# Altium PCB SOM_PCB_6Layer.PcbDoc (part 6 of 6)
Units mil, origin at the board's own origin, x right, y up, seen from the top; angles counter-clockwise.
Board outline 1230 x 2725 mil, 6 copper layers (Top Layer, GND+SHIELD, MidLayer1, MidLayer2, PWR, Bottom Layer), stack 60.8 mil thick; 76 components, 194 nets, 972 pads, 577 vias.
Unrouted connection lines stored in the file: 151.
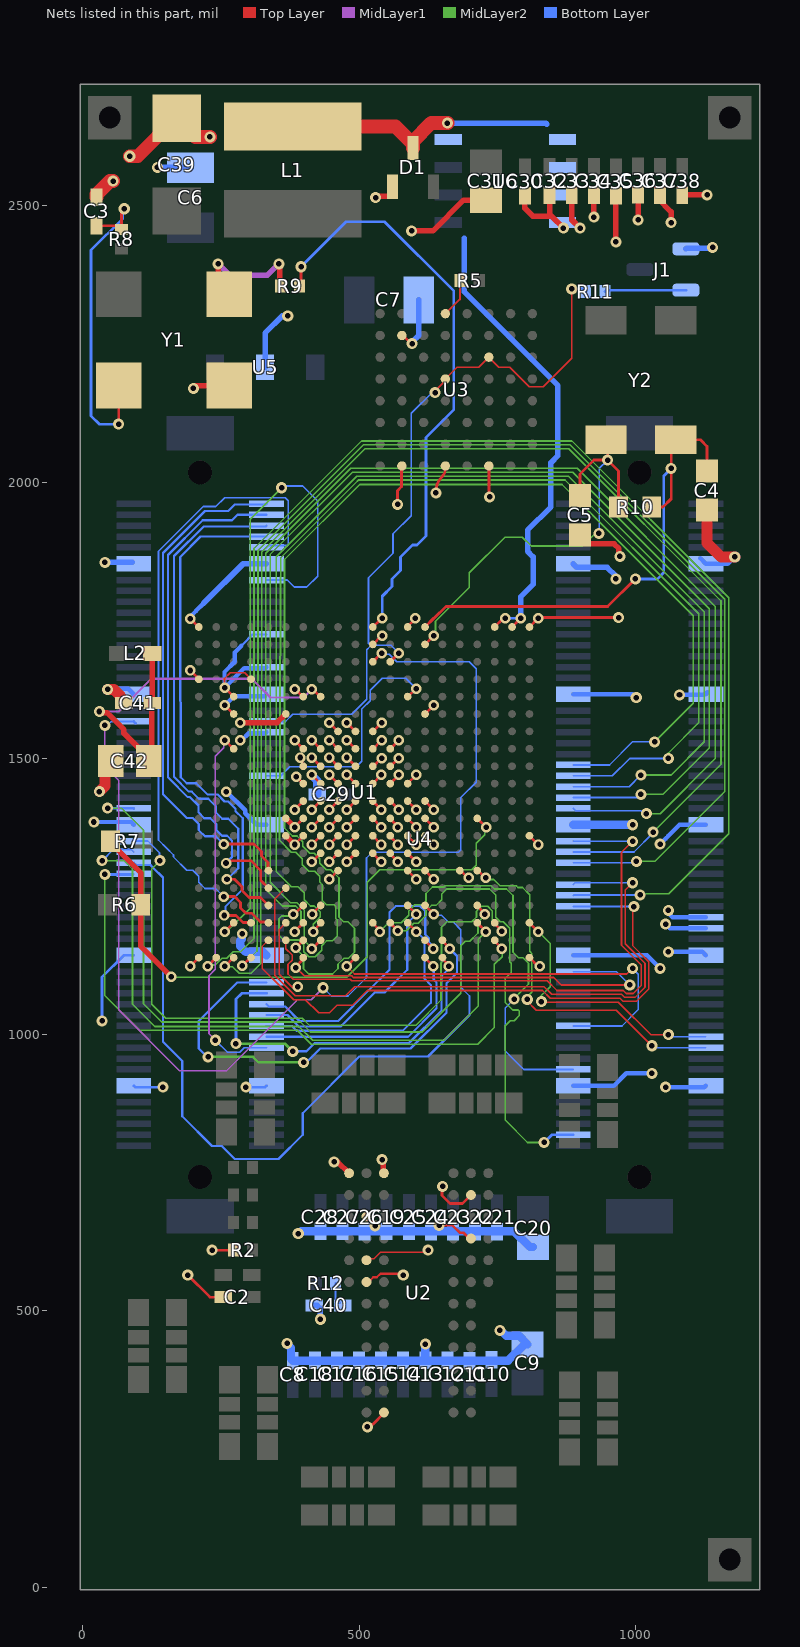
[diagram p9: the nets of this part, all layers, seen from the top]

## Via types
v1: diameter 19, hole 10, Top Layer to Bottom Layer, tented both sides, 352 vias
v2: diameter 20, hole 10, Top Layer to Bottom Layer, tented both sides, 223 vias
v3: diameter 20, hole 10, Top Layer to Bottom Layer, 1 vias
v4: diameter 30, hole 15, Top Layer to Bottom Layer, tented both sides, 1 vias

## Nets (pads, with @x,y where several pads share a name; then routed paths per layer and width w, separated by ;. In a path a pad name is that pad's centre, name@x,y a point inside that pad or via, vN(x,y) a via of type N, cw(c..) or ccw(c..) an arc to the next point about the centre after c; other vN are vias at no path point) (continued)
GND: C2.1 C3.1 C4.1 C5.1 C6.2 C7.2 C8.1 C9.1 C10.1 C11.1 C12.1 C13.1 C14.1 C15.1 C16.1 C17.1 C18.1 C19.1 C20.1 C21.1 C22.1 C23.1 C24.1 C25.1 C26.1 C27.1 C28.1 C29.1 C30.1 C31.1 C32.1 C33.1 C34.1 C35.1 C36.1 C37.1 C38.1 C39.2 C40.1 C41.1 C42.1 D1.3 J1.1 R2.1 U1.A1 U1.A13 U1.A20 U1.B11 U1.D1 U1.D4 U1.E3 U1.E7 U1.F3 U1.F6 U1.F14 U1.G9 U1.G10 U1.G11 U1.H7 U1.H8 U1.H9 U1.H10 U1.H11 U1.H12 U1.J7 U1.J8 U1.J9 U1.J10 U1.J11 U1.J12 U1.K7 U1.K8 U1.K9 U1.K10 U1.K11 U1.K12 U1.K13 U1.L7 U1.L8 U1.L9 U1.L10 U1.L11 U1.L12 U1.L13 U1.L14 U1.M6 U1.M7 U1.M8 U1.M9 U1.M10 U1.M11 U1.M12 U1.M13 U1.M14 U1.N6 U1.N7 U1.N8 U1.N9 U1.N10 U1.N11 U1.N12 U1.N13 U1.N14 U1.N20 U1.P8 U1.P9 U1.P10 U1.P11 U1.P12 U1.P13 U1.R9 U1.R13 U1.R14 U1.R16 U1.U8 U1.V6 U1.Y1 U1.Y20 U2.A1 U2.A3 U2.B8 U2.C2 U2.D8 U2.E2 U2.F2 U2.M3 U3.B2 U3.H2 U3.H4 U3.H6 U4.61 U4.64 U4.68 U4.183 U4.184 U4.201 U4.202 U4.203 U4.204 U4.205 U4.206 U4.207 U4.208 U4.209 U4.210 U4.213 U4.214 U4.215 U4.216 U4.217 U4.218 U4.219 U4.220 U4.221 U4.222 U5.2 Y1.2 | length 7856.5
  Top Layer w3: v1(256.53,1627.72) 256.61,1627.79 256.61,1644.72 266.85,1654.96 293.03,1654.96 U1.D4@304.53,1643.46 ; U1.V6@367.52,1202.52 355.52,1190.52 355.52,1127.82 355.52,1109.48 380,1085 387.55,1085 v1(389.01,1086.46) ; U2.E2@513.5,591.89 516.01,594.4 527,594.4 538.99,606.39 621.39,606.39 v2(625,610)
  Top Layer w4: U2.F2@513.5,552.52 517.29,552.52 525.66,560.89 532.16,560.89 538.79,567.52 577.48,567.52 v2(580,565)
  Top Layer w5: v2(190,565) 230,525 C2.1@254.24,525 ; v1(194.29,1123.78) U1.Y1@210.04,1139.53 ; v1(194.5,1659.21) 194.5,1659.11 210.04,1643.57 U1.D1@210.04,1643.46 ; v1(194.5,1752.9) 194.8,1752.9 209.74,1737.95 U1.A1@210.04,1737.95 ; v2(234,610) R2.1@272.48,610 ; v1(256.53,1627.72) 257.28,1627.72 U1.E3@273.03,1611.97 ; v1(257.28,1596.22) U1.F3@273.03,1580.47 ; v1(383.27,1344.25) U1.N7@399.02,1360 ; v1(383.27,1375.75) U1.M7@399.02,1391.5 ; v1(383.27,1407.24) U1.L7@399.02,1422.99 ; v1(383.27,1533.23) U1.H7@399.02,1517.48 ; v1(383.27,1625.21) 384.52,1625.21 397.76,1611.97 U1.E7@399.02,1611.97 ; v1(386.26,1467.25) U1.K7@399.02,1454.49 ; v1(394.02,1501.73) 394.02,1497.94 397.29,1494.67 397.29,1487.71 U1.J7@399.02,1485.98 ; v1@412.69,1220 v1(414.92,1217.77) 414.92,1218.1 430.51,1233.69 U1.U8@430.51,1234.02 ; v1(414.76,1312.76) U1.P8@430.51,1328.5 ; v1(414.76,1344.25) U1.N8@430.51,1360 ; v1(414.76,1375.75) U1.M8@430.51,1391.5 ; v1(414.76,1407.24) U1.L8@430.51,1422.99 ; v1(414.76,1470.24) U1.K8@430.51,1454.49 ; v1(414.76,1501.73) U1.J8@430.51,1485.98 ; v1(414.76,1533.23) U1.H8@430.51,1517.48 ; v1(446.26,1281.26) U1.R9@462.01,1297.01 ; v1(446.26,1312.76) U1.P9@462.01,1328.5 ; v1(446.26,1344.25) U1.N9@462.01,1360 ; v1(446.26,1375.75) U1.M9@462.01,1391.5 ; v1(446.26,1407.24) U1.L9@462.01,1422.99 ; v1(446.26,1470.24) U1.K9@462.01,1454.49 ; v1(446.26,1501.73) U1.J9@462.01,1485.98 ; v1(446.26,1533.23) U1.H9@462.01,1517.48 ; v1(446.26,1564.72) U1.G9@462.01,1548.98 ; v1(477.76,1312.76) U1.P10@493.5,1328.5 ; v1(477.76,1344.25) U1.N10@493.5,1360 ; v1(477.76,1375.75) U1.M10@493.5,1391.5 ; v1(477.76,1407.24) U1.L10@493.5,1422.99 ; v1(477.76,1470.24) U1.K10@493.5,1454.49 ; v1(477.76,1501.73) U1.J10@493.5,1485.98 ; v1(477.76,1533.23) U1.H10@493.5,1517.48 ; v1(477.76,1564.72) U1.G10@493.5,1548.98 ; U2.C2@513.5,670.63 514.37,670.63 529.05,655.95 v2(529.05,654.05) ; v2(515,290) 519.06,290 524.06,295 525,295 545,315 U2.M3@545,316.3 ; U1.P11@525,1328.5 525,1328.13 540,1313.13 v1(540,1312.76) ; U1.N11@525,1360 525,1359.63 540,1344.63 v1(540,1344.25) ; U1.M11@525,1391.5 525,1391.12 540,1376.12 v1(540,1375.75) ; U1.L11@525,1422.99 525,1422.62 540,1407.62 v1(540,1407.24) ; U1.K11@525,1454.49 525,1454.86 540,1469.86 v1(540,1470.24) ; U1.J11@525,1485.98 525.87,1485.98 539.88,1500 v1(540.75,1500) ; U1.H11@525,1517.48 v1(540.75,1533.23) ; U1.G11@525,1548.98 v1(540.75,1564.72) ; U1.B11@525,1706.46 540.75,1722.2 v1(542,1722.2) ; U1.P12@556.5,1328.5 556.5,1327.38 570,1313.88 v1(570,1312.76) ; U1.N12@556.5,1360 556.5,1358.88 570,1345.37 v1(570,1344.25) ; U1.M12@556.5,1391.5 556.5,1390.37 570,1376.87 v1(570,1375.75) ; U1.L12@556.5,1422.99 v1(572.24,1407.24) ; U1.K12@556.5,1454.49 v1(572.24,1470.24) ; U1.J12@556.5,1485.98 557.24,1485.98 571.5,1500.24 v1(572.24,1500.24) ; U1.H12@556.5,1517.48 v1(572.24,1533.23) ; v2(570,1960) 569.5,1960.5 569.5,1984.5 577,1992 577,2028.89 U3.H2@577.52,2029.41 ; U3.B2@577.52,2265.63 579.4,2265.63 594.07,2250.96 v2(595.96,2250.96) ; U1.R13@587.99,1297.01 v1(603.74,1281.26) ; U1.P13@587.99,1328.5 v1(603.74,1312.76) ; U1.N13@587.99,1360 v1(603.74,1344.25) ; U1.M13@587.99,1391.5 v1(603.74,1375.75) ; U1.L13@587.99,1422.99 v1(603.74,1407.24) ; U1.K13@587.99,1454.49 v1(603.74,1470.24) ; U1.A13@587.99,1737.95 587.99,1738.82 602,1752.83 v1(602,1753.7) ; U1.R14@619.49,1297.01 v1(635.24,1281.26) ; U1.N14@619.49,1360 v1(635.24,1344.25) ; U1.M14@619.49,1391.5 v1(635.24,1375.75) ; U1.L14@619.49,1422.99 v1(635.24,1407.24) ; U1.F14@619.49,1580.47 v1(635.24,1596.22) ; v2(639,1980.5) 639,1982.5 cw(c678.83,1982.5) 650.67,2010.67 ccw(c637.17,2024.17) 650.71,2010.71 ccw(c637.17,2024.17) 653.96,2015.09 ccw(c637.17,2024.17) 656.26,2024.17 U3.H4@656.26,2029.41 ; v2(645,655) 669.16,655 682.66,641.5 689.39,641.5 699.63,631.26 U2.D8@702.48,631.26 ; v2(651.15,725.37) 650,724.22 650,709.06 664.56,694.5 686.98,694.5 U2.B8@702.48,710 ; U1.R16@682.48,1297.01 683.73,1297.01 696.98,1283.76 v1(698.23,1283.76) ; U3.H6@735,2029.41 735,1974.93 v2(736.43,1973.5) ; U1.Y20@808.46,1139.53 823.99,1124 v1(826.72,1124) ; U1.N20@808.46,1360 v1(824.21,1344.25) ; U1.A20@808.46,1737.95 808.46,1738.1 824.2,1753.83 v1(824.2,1753.98) 825.22,1755 v2(970,1755)
  Top Layer w8: C42.1@31.36,1475.77 C42.1@50.59,1495
  Top Layer w10: v2(200,2170) 205,2175 Y1.2@265,2175 ; v1(285,1565) 351.88,1565 367.35,1580.47 U1.F6@367.52,1580.47 ; U1.N6@367.52,1360 v1(383.27,1344.25) ; U1.M6@367.52,1391.5 v1(383.27,1375.75) ; v2(455,770) 461.38,770 U2.A1@482.01,749.37 ; v2(530,2515) 532.71,2515 535.71,2518 555.2,2518 560.2,2523 D1.3@560.2,2535 ; v2(541.63,774) 543.47,772.16 543.47,750.9 U2.A3@545,749.37 ; v2(595,2455) 633.67,2455 689.26,2510.59 C31.1@730,2510.59 ; C30.1@800,2518.47 800,2495.86 814.47,2481.39 848.61,2481.39 ; C32.1@845,2519.24 845,2485 848.61,2481.39 ; v2(870,2460) 848.61,2481.39 ; C33.1@885,2519.24 885,2475 v2(900,2460) ; C5.1@900,1904.5 900,1903.5 915,1888.5 961.5,1888.5 970.25,1879.75 970.25,1867.83 v2(972.16,1865.91) ; v2(925,2480) C34.1@925,2519.24 ; v2(965,2435) C35.1@965,2518.47 ; v2(1005,2475) C36.1@1005,2520 ; C37.1@1045,2519.24 1040,2514.24 1065,2489.24 v2(1065,2470) ; C38.1@1085,2519.24 1085.76,2520 v2(1130,2520)
  Top Layer w20: v2(30,1440) 40.5,1450.5 40.5,1484.91 C42.1@50.59,1495 ; v2(45,1625) 56.6,1625 68.31,1613.28 68.31,1600.84 69.16,1600 C41.1@74.24,1600 ; C4.1@1130,1949.5 1130,1890 1155,1865 v2(1180,1865)
  Top Layer w25: C3.1@25,2515.76 25,2520.84 49.16,2545 v2(55,2545) ; v2(85,2590) 99.51,2590 168.63,2659.11 C39.2@170,2659.11 204.11,2625 v2(230,2625)
  Bottom Layer w3: U4.205@89.72,1855 U4.205@92.28,1852.44
  Bottom Layer w4: 287.18,1704.02 299.36,1716.2 299.36,1717 306.85,1724.49 U4.61@332.44,1724.49
  Bottom Layer w5: v2(35,1025) 35,1104.21 74.57,1143.78 U4.202@92.28,1143.78 ; U4.201@92.28,907.56 94.84,905 v2(145,905) ; v2(295,905) 329.88,905 U4.210@332.44,907.56
  Bottom Layer w8: v2(20,1385) 87.28,1385 U4.203@92.28,1380 ; v2@44,1626 82.5,1626 U4.204@92.28,1616.22 ; v1(194.5,1752.9) 194.5,1756.26 204.18,1765.94 204.18,1766.23 218.97,1781.03 ; v1(257.28,1596.22) 273.78,1612.72 328.94,1612.72 U4.207@332.44,1616.22 ; v1(259.99,1439.99) 293.94,1406.04 293.94,1400.72 299.23,1395.44 299.29,1395.44 314.72,1380 U4.208@332.44,1380 ; v1(285.28,1533.23) 288.26,1533.23 300.45,1545.42 330.54,1545.42 U4.68@332.44,1547.32 ; 287.18,1704.02 275,1691.83 275,1675 256.53,1656.53 v1(256.53,1627.72) 292.34,1663.53 330.54,1663.53 U4.64@332.44,1665.43 ; U4.213@887.56,907.56 961.31,907.56 983.75,930 v2(1030,930) ; U4.214@887.56,1143.78 1021.22,1143.78 v2(1045,1120) ; U4.216@887.56,1616.22 995.53,1616.22 v2(1001.75,1610) ; v2(1045,1345) 1055,1355 1055.31,1355 1060,1359.69 1060,1360 1080,1380 U4.220@1127.72,1380 ; v2(1055,905) 1125.16,905 U4.218@1127.72,907.56 ; v2(1055,1200) 1062.01,1192.99 U4.184@1127.72,1192.99 ; v2(1060,1150) 1121.5,1150 U4.219@1127.72,1143.78 ; v2(1060,1225) 1060,1220 1067.32,1212.68 U4.183@1127.72,1212.68 ; v2(1080,1615) 1125,1615 1130,1620 1130,1618.5 U4.221@1127.72,1616.22 ; U4.222@1117.94,1862.22 U4.222@1127.72,1852.44 1167.44,1852.44 v2(1180,1865)
  Bottom Layer w10: v2(40,1855) U4.205@89.72,1855 ; v2(135,2570) 194.13,2570 C6.2@195,2569.13 ; 218.97,1781.03 290.39,1852.44 U4.206@332.44,1852.44 ; U5.2@330,2208.3 330,2270 361,2301 v2(371,2301) ; C40.1@419.24,510 424.16,510 430,504.16 v2(430,485) ; v2(595.96,2250.96) 595.96,2253.66 608.27,2265.97 C7.2@608.27,2330 ; U4.217@887.56,1852.44 894,1846 949,1846 965,1830 v2(965,1825) ; J1.1@1091.73,2422.4 1093.03,2423.7 1138.7,2423.7 v2(1140,2425)
  Bottom Layer w15: v1(288.63,1182.72) 287.87,1181.96 287.87,1172.98 285,1170.12 285,1160 294.94,1150.06 326.16,1150.06 U4.209@332.44,1143.78 ; v2(370,441.5) 370.96,440.54 370.96,439.04 376.66,433.34 376.66,413.34 C8.1@380,410 C11.1@700,410 769.88,410 799.29,439.41 C9.1@805,439.41 789.27,455.14 766.22,455.14 756.35,465 v2(755,465) ; v2(390,640) 391.35,640 395.59,644.24 C28.1@430,644.24 C27.1@470,644.24 C19.1@550,644.24 C25.1@590,644.24 780.65,644.24 809.29,615.59 C20.1@815,615.59 ; v1(414.76,1470.24) 414.76,1469.15 424.24,1459.68 C29.1@424.24,1435 ; C13.1@620,410.76 v2(620,440) ; U4.215@887.56,1380 v2(995,1380)
JTAG_E\M\U\: U1.R5 U4.51 | length 928.3
  Top Layer w5: v1(255,1345) 310,1345 323.52,1331.48 323.52,1323.33 335.34,1311.51 335.34,1297.69 U1.R5@336.02,1297.01
  Bottom Layer w4: v1(255,1345) 254.81,1345 240.56,1359.25 221.07,1359.25 210.04,1370.28 210.04,1381.21 199.01,1392.24 188.08,1392.24 151.75,1428.57 145,1435.32 145,1871.77 221.3,1948.07 263.43,1948.07 275,1959.64 331.37,1959.64 U4.51@332.44,1960.71
JTAG_T\R\S\T\: U1.T5 U4.52 | length 942.2
  Top Layer w5: v1(259.22,1310.78) 260,1311.55 260,1312.07 262.93,1315 304.21,1315 322,1297.21 322,1279.53 U1.T5@336.02,1265.51
  Bottom Layer w4: v1(259.22,1310.78) 270,1321.55 270,1351.21 261.21,1360 251.82,1360 241.45,1370.37 241.45,1381.3 230.84,1391.91 219.91,1391.91 209.29,1402.53 209.29,1414.7 193.99,1430 190,1430 155.43,1464.57 154.45,1465.55 154.45,1796.24 154.23,1796.45 154.23,1868.27 217.21,1931.25 270.23,1931.25 280,1941.02 U4.52@332.44,1941.02
JTAG_TCK: U1.V3 U4.56 | length 1189.6
  Top Layer w5: v1(257.28,1186.77) U1.V3@273.03,1202.52
  MidLayer2 w3: v1(257.28,1186.77) 260.77,1186.77 302.9,1228.9 302.9,1932.9 v2(360,1990)
  Bottom Layer w3: U4.56@332.44,1822.91 370.17,1822.91 382.75,1810.33 405.33,1810.33 425,1830 425,1966.09 397.9,1993.19 363.19,1993.19 v2(360,1990)
JTAG_TDI: U1.V5 U4.55 | length 1196.8
  Top Layer w5: v1(255,1250) 275,1250 285.53,1239.47 285.53,1229.47 295,1220 305.55,1220 321.52,1204.03 334.51,1204.03 U1.V5@336.02,1202.52
  Bottom Layer w3: v1(255,1250) 240.24,1264.76 221.07,1264.76 210.04,1275.79 210.04,1286.73 199.01,1297.76 188.08,1297.76 164.04,1321.8 164.04,1325.42 151.75,1337.71 137,1352.46 137,1875.08 217.99,1956.07 240.88,1956.07 256.93,1972.11 366.22,1972.11 372.13,1966.2 372.13,1887.13 370.37,1885.37 335.85,1885.37 U4.55@332.44,1881.97
JTAG_TDO: U1.V4 U4.54 | length 959.8
  Top Layer w5: v1(255.85,1215.79) 277.44,1215.79 290.03,1203.2 303.85,1203.2 U1.V4@304.53,1202.52
  Bottom Layer w4: v1(255.85,1215.79) 258.52,1218.45 258.52,1232.3 289.41,1263.2 289.41,1391.82 276.16,1405.07 276.16,1409.58 263.45,1422.29 256.48,1422.29 243.77,1435 225.52,1435 205.29,1455.24 188.08,1455.24 177.38,1465.94 177.38,1500.01 176.23,1705.01 176.23,1792.61 176.23,1796.24 176.23,1864.82 213.07,1901.65 U4.54@332.44,1901.65
JTAG_TMS: U1.U5 U4.53 | length 949.9
  Top Layer w5: v1(261,1281.26) 274.96,1281.26 288.35,1267.87 288.35,1261.33 301.15,1248.53 321.5,1248.53 U1.U5@336.02,1234.02
  Bottom Layer w4: v1(261,1281.26) 261.2,1281.26 281.41,1301.47 281.41,1372.84 263.5,1390.75 252.57,1390.75 240.79,1402.53 240.79,1413.46 227.24,1427 210.12,1427 197.12,1440 192,1440 165,1467 165,1796.24 165,1866.31 218.69,1920 331.1,1920 U4.53@332.44,1921.34
N\M\I\: U1.C11 U4.34 | length 2100
  Top Layer w5: U1.C11@525,1674.96 v1(540.75,1690.71)
  MidLayer1 w3: v2(40,1560) 40,1485 65,1460 65,1045 175,935 260.15,935 388.65,1063.5 413.5,1063.5 v2(435,1085)
  Bottom Layer w3: v2(40,1560) 44.6,1560 51.61,1567.01 U4.34@92.28,1567.01 ; v2(435,1085) 450,1070 480,1070 513.56,1103.56 513.56,1320 523.56,1330 680,1330 684.23,1334.23 684.23,1429.23 712.23,1457.23 712.23,1662.51 699.74,1675 568.15,1675 554.75,1688.41 543.05,1688.41 v1(540.75,1690.71)
  Bottom Layer w5: U4.34@92.28,1567.01 U4.34@95.69,1563.6
NetC3_2: C3.2 R8.2 Y1.1 | length 613.4
  Top Layer w5: C3.2@25,2464.24 63.28,2464.24 R8.2@70,2457.52 70,2485.94 75,2490.94 v2(75,2495) ; v2(65,2105) Y1.1@65,2175
  Bottom Layer w5: v2(65,2105) 30,2105 15,2120 15,2420 72.5,2477.5 72.5,2492.5 v2(75,2495)
NetC4_2: C4.2 R10.1 U1.A14 Y2.1 | length 949.3
  Top Layer w5: U1.A14@619.49,1737.95 635.24,1753.7 636,1753.7 657.3,1775 950,1775 v2(1000,1825) ; R10.1@1030,1955 1050,1955 1065,1970 v2(1065,2025) 1065,2068.74 Y2.1@1072.99,2076.73 1084.8,2076.73 1118.27,2076.73 1119.98,2075.02 1130,2065 C4.2@1130,2020.5 C4.2@1112.5,2038
  Bottom Layer w5: v2(1000,1825) 1040,1825 1051.5,1836.5 1051.5,2011.5 v2(1065,2025)
NetC5_2: C5.2 R10.2 U1.B14 Y2.4 | length 830.4
  Top Layer w3: R10.2@955.33,1969.43 R10.2@969.76,1955
  Top Layer w5: U1.B14@619.49,1706.46 v1(635.24,1722.2) ; C5.2@900,1975.5 900,2015 925,2040 v2(950,2040) ; Y2.4@947.01,2076.73 950,2073.74 v2(950,2040) ; R10.2@969.76,1955 969.76,2020.24 v2(950,2040)
  MidLayer2 w3: v1(635.24,1722.2) 638.3,1725.27 638.3,1748.3 699.5,1809.5 699.5,1835.96 764.04,1900.5 795.42,1900.5 811.42,1884.5 904.5,1884.5 926.95,1906.95 v2(934,1907.5)
  Bottom Layer w3: v2(934,1907.5) 934,1909 935,1910 935,2025 v2(950,2040)
NetC40_2: C40.2 R12.1 | length 38.1
  Bottom Layer w4: R12.1@457.52,550 457.52,522.48 C40.2@465,515
NetC41_2: C41.2 C42.2 L2.2 U1.E8 | length 782.5
  Top Layer w5: v1(414.76,1625.21) 416.02,1625.21 429.26,1611.97 U1.E8@430.51,1611.97
  Top Layer w10: v2(30,1585) 31.91,1583.09 43.78,1583.09 74.53,1552.34 74.53,1545.59 119.41,1500.71 C42.2@119.41,1495 122.26,1497.85 125,1500.59 125,1599.24 C41.2@125.76,1600 125.51,1600.25 L2.2@125.51,1690
  MidLayer1 w4: v2(30,1585) 65,1585 124.15,1644.15 305.85,1644.15 339.79,1610.21 399.76,1610.21 v1(414.76,1625.21)
NetD1_1: D1.1 L1.1 U6.5 U6.6 U6.7 U6.8 | length 499.5
  Top Layer w25: L1.1@380,2643.74 565.86,2643.74 D1.1@597.6,2612 ; D1.1@597.6,2605 D1.1@597.6,2612 ; v2(660,2650) 630.6,2650 597.6,2617 D1.1@597.6,2612
  Bottom Layer w10: v2(660,2650) 838.25,2650 840,2648.25
NetJ1_2: J1.2 R11.1 | length 147.8
  Bottom Layer w5: R11.1@945,2345 947.6,2347.6 J1.2@1091.73,2347.6
NetR5_1: R5.1 U3.A4 | length 70.9
  Top Layer w4: U3.A4@656.26,2305 682.48,2331.22 R5.1@682.48,2365
NetR6_1: R6.1 R7.1 U1.M17 | length 1105.1
  Top Layer w5: U1.M17@713.98,1391.5 729.72,1375.75 v1(730,1375.75)
  Top Layer w10: R7.1@50,1350 50,1347.64 105.12,1292.52 R6.1@105.12,1235 105.12,1159.88 v1(160,1105)
  MidLayer2 w3: v1(160,1105) 161.22,1103.78 477.55,1103.78 515,1141.22 515,1276.06 537.7,1298.76 704.03,1298.76 712.23,1306.96 712.23,1346.55 727.42,1361.75 727.42,1373.17 v1(730,1375.75)
NetR9_1: R9.1 Y1.3 | length 230.5
  Top Layer w10: v2(245,2395) 245,2360.35 Y1.3@265,2340.35 ; v2(355,2395) 356.24,2393.76 356.24,2356.24 R9.1@357.48,2355
  MidLayer1 w10: v2(245,2395) 245.86,2395 265.86,2375 334.14,2375 354.14,2395 v2(355,2395)
NetR9_2: R9.2 U1.A11 | length 1072.5
  Top Layer w5: R9.2@392.52,2355 395,2357.48 v2(395,2390) ; U1.A11@525,1737.95 525.63,1737.95 541.37,1753.7 v1(542,1753.7)
  Bottom Layer w5: v2(395,2390) 476.5,2471.5 545.84,2471.5 671.57,2345.77 671.57,2131.57 621,2081 621,1902.67 604.83,1886.5 596.7,1886.5 575,1864.8 575,1840 559.84,1824.84 559.84,1811.5 542,1793.67 v1(542,1753.7)
NetU1_A18: U1.A18 U1.A19 U6.4 | length 871.2
  Top Layer w5: U1.A18@745.47,1737.95 745.47,1738.06 761,1753.59 764.89,1753.59 v1(765,1753.7) ; U1.A19@776.97,1737.95 792.72,1753.7 v1(793,1753.7)
  Bottom Layer w5: v1(765,1753.7) v1(793,1753.7)
  Bottom Layer w10: 690,2441.75 690,2345 860,2175 860,2048.13 847.06,2035.19 847.06,1955.19 805,1913.13 805,1875 815,1865 815,1815 793,1793 v1(793,1753.7)
PB2: U1.T6 U4.121 | length 1192.3
  Top Layer w3: U1.T6@367.52,1265.51 347.52,1245.52 347.52,1107.48 362.76,1092.24 373.76,1081.24 384.5,1070.5 475.6,1070.5 492.1,1087 834.82,1087 848.82,1073 975.18,1073 980.68,1067.5 999.32,1067.5 1017.5,1085.68 1017.5,1129.32 982,1164.82 982,1262 v2(995,1275)
  Bottom Layer w3: U4.121@887.56,1271.73 890.83,1275 v2(995,1275)
RESET: R11.2 U1.C12 U3.C6 U3.D4 U4.67 | length 1365.4
  Top Layer w3: v2(637.7,2162.3) 637.7,2165.31 656.26,2183.87 U3.D4@656.26,2186.89 677.26,2207.89 716.63,2207.89 U3.C6@735,2226.26 753.12,2208.13 772.92,2208.13 788.37,2192.69 788.37,2192.46 807.94,2172.89 833.5,2172.89 885,2224.39 v2(885,2350)
  Top Layer w5: U1.C12@556.5,1674.96 v1(572.24,1690.71)
  Bottom Layer w3: U4.67@332.44,1567.01 367.01,1567.01 380,1580 486.97,1580 514.07,1607.1 514.07,1696.57 520,1702.5 520,1705 ; v1(572.24,1690.71) 557.95,1705 520,1705 ; v2(637.7,2162.3) 635.22,2162.3 633.76,2163.76 594.53,2124.53 594.53,1939.53 561.5,1906.5 561.5,1871.5 517.06,1827.06 517.06,1707.94 520,1705 ; R11.2@904.96,2350 R11.2@909.96,2345
  Bottom Layer w4: v2(885,2350) R11.2@904.96,2350
RSCLK0: U1.H3 U4.93 | length 687.3
  Top Layer w5: v1(257.28,1533.23) U1.H3@273.03,1517.48
  MidLayer1 w3: v2(240,990) 228.48,1001.52 228.48,1106.67 240,1118.19 240,1504.25 254.98,1519.23 254.98,1530.93 v1(257.28,1533.23)
  Bottom Layer w3: v2(240,990) 262,968 283.92,968 292.38,976.46 U4.93@332.44,976.46
SCL1: U1.W5 U4.119 | length 1095.1
  Top Layer w3: U1.W5@336.02,1171.02 324.52,1159.52 324.52,1120.58 363.86,1081.24 381.6,1063.5 402.8,1063.5 426.8,1039.5 446.42,1039.5 460.11,1053.19 488.19,1053.19 515,1080 831.92,1080 845.92,1066 972.28,1066 977.78,1060.5 1002.22,1060.5 1024.5,1082.78 1024.5,1132.22 995.09,1161.62 995.09,1228.14 997.5,1230.54 v2(997.5,1231.68)
  Bottom Layer w3: U4.119@887.56,1232.36 888.01,1231.92 995.09,1231.92 995.33,1231.68 v2(997.5,1231.68)
SD_CLK: U1.Y15 U4.88 | length 654.5
  Top Layer w5: U1.Y15@650.98,1139.53 650.98,1137.39 662.23,1126.14 v1(662.23,1124)
  MidLayer2 w5: v2(277.17,983.83) 277.5,983.5 366.5,983.5 v2(380,970)
  Bottom Layer w4: v2(380,970) 405,970 420,985 590.46,985 649,1043.54 649,1106.05 662.52,1119.57 662.52,1123.71 v1(662.23,1124)
  Bottom Layer w5: v2(277.17,983.83) 277.5,984.17 277.5,1064.67 287.71,1074.88 U4.88@332.44,1074.88
SD_CMD: U1.W15 U4.87 | length 846.9
  Top Layer w5: U1.W15@650.98,1171.02 650.98,1169.77 664.23,1156.53 v1(664.23,1155.28)
  MidLayer2 w5: v2(227,960) 308.33,960 318.33,950 v2(399.65,950)
  Bottom Layer w4: v2(227,960) 225,960 210,975 210,1025 279.57,1094.57 U4.87@332.44,1094.57 ; v2(399.65,950) 405,950 430,975 593.18,975 658.5,1040.32 658.5,1093.5 677.23,1112.23 677.23,1142.28 v1(664.23,1155.28)
SD_D0: U1.Y14 U4.92 | length 429.5
  Top Layer w5: U1.Y14@619.49,1139.53 619.49,1139.13 634.23,1124.39 v1(634.23,1124)
  Bottom Layer w4: U4.92@332.44,996.14 588.87,996.14 640,1047.27 640,1095 635.24,1099.76 635.24,1122.99 v1(634.23,1124)
SD_D1: U1.V13 U4.91 | length 484.5
  Top Layer w5: U1.V13@587.99,1202.52 v1(603.74,1186.77)
  Bottom Layer w4: U4.91@332.44,1015.83 378.21,1015.83 387.04,1007 579.33,1007 630,1057.67 630,1090 618.74,1101.26 618.74,1171.77 v1(603.74,1186.77)
SD_D2: U1.U13 U4.90 | length 435.6
  Top Layer w5: U1.U13@587.99,1234.02 v1(603.74,1218.27)
  Bottom Layer w4: U4.90@332.44,1035.51 370.55,1035.51 391.06,1015 466.67,1015 528.2,1076.54 546.22,1076.54 587.24,1117.57 587.24,1201.77 v1(603.74,1218.27)
SD_D3: U1.W14 U4.89 | length 547.4
  Top Layer w5: U1.W14@619.49,1171.02 619.49,1170.52 634.23,1155.78 v1(634.23,1155.28)
  Bottom Layer w4: U4.89@332.44,1055.2 336.35,1051.29 366.08,1051.29 392.37,1025 462.47,1025 518.71,1081.24 555.25,1117.77 555.25,1221.78 566.24,1232.77 610.45,1232.77 620,1223.22 620,1181.5 626.24,1175.26 626.24,1168.2 635.04,1159.4 634.23,1158.59 v1(634.23,1155.28)
SDA1: U1.Y2 U4.120 | length 2644.8
  Top Layer w5: v1(225.79,1123.78) U1.Y2@241.54,1139.53
  MidLayer2 w3: v1(225.79,1123.78) 228.09,1126.08 239.79,1126.08 252.13,1138.42 260.64,1138.42 272.22,1150 285.49,1150 310,1174.51 310,1879.9 504.6,2074.5 880.5,2074.5 885.3,2074.5 1169,1790.8 1169,1786 1169,1363.66 1060.34,1255 1010.69,1255 v2(1008.63,1252.94)
  Bottom Layer w3: U4.120@887.56,1252.05 888.45,1252.94 v2(1008.63,1252.94)
TACLK6: U1.Y7 U4.115 | length 753.6
  Top Layer w3: v1(385.55,1121.5) 400.55,1106.5 486.55,1106.5 489.55,1103.5 852.5,1103.5 866,1090 866.75,1090 v2(990,1090)
  Top Layer w5: v1(385.55,1121.5) 385.55,1123.78 399.02,1137.24 U1.Y7@399.02,1139.53
  Bottom Layer w3: U4.115@887.56,1114.25 965.75,1114.25 v2(990,1090)
TMR0: U1.W8 U4.127 | length 2268.7
  Top Layer w5: v1(414.76,1155.28) U1.W8@430.51,1171.02
  MidLayer2 w3: v1(414.76,1155.28) 414.76,1156.63 400.92,1170.47 400.92,1225.8 387.7,1239.03 375.97,1239.03 340.24,1274.76 339.45,1275.55 339,1297.95 cw(c342,1298.01) 339,1298.01 339,1796.24 339,1869 488,2018 887,2018 1134,1771 1134,1519 1050,1435 v2(1010,1435)
  Bottom Layer w3: U4.127@887.56,1429.21 1004.21,1429.21 v2(1010,1435)
TMR1: U1.V8 U4.128 | length 2191.8
  Top Layer w5: v1(417.27,1186.77) 417.27,1188.02 430.51,1201.27 U1.V8@430.51,1202.52
  MidLayer2 w3: v1(417.27,1186.77) 417.27,1199.73 425.17,1208.23 ccw(c414.92,1217.77) 425.43,1208.52 429.76,1213.43 429.76,1222.13 425.45,1227 ccw(c414.92,1217.77) 424.18,1228.27 418.88,1232.98 412.02,1232.98 400.55,1244.45 400.55,1256.84 389.38,1268 377.47,1268 372.73,1272.73 350,1295.47 350,1796.24 350,1865 496,2011 879,2011 1125,1765 1125,1530 1065,1470 v2(1010,1470)
  Bottom Layer w3: U4.128@887.56,1448.9 988.9,1448.9 v2(1010,1470)
TMR2: U1.U7 U4.129 | length 2365.5
  Top Layer w5: v1(380.55,1217.89) 381.04,1218.38 383.38,1218.38 U1.U7@399.02,1234.02
  MidLayer2 w3: v1(380.55,1217.89) 377.66,1215 360,1215 355,1210 355,1180 363.44,1171.56 391.35,1171.56 400.16,1162.75 400.16,1150.08 408.97,1141.28 420.56,1141.28 432.26,1152.97 432.26,1161.07 440.96,1169.78 451.56,1169.78 460.26,1178.48 460.26,1207.48 457.76,1209.98 457.76,1232.24 455,1235 441.22,1235 433.11,1243.11 433.11,1271.89 428.76,1276.24 428.76,1287.06 419.79,1296.03 408.97,1296.03 397.27,1307.73 397.27,1318.55 385.57,1330.25 377.47,1330.25 356.88,1350.84 356,1351.72 356,1354.21 357.74,1796.24 358,1862.9 497.24,2002.24 499,2004 872.82,2004 1115,1761.82 1115,1565 1060,1510 v2(1060,1500)
  Bottom Layer w3: U4.129@887.56,1468.58 958.58,1468.58 990,1500 v2(1060,1500)
TMR3: U1.W7 U4.130 | length 2279.4
  Top Layer w5: v1(385.55,1157.56) U1.W7@399.02,1171.02
  MidLayer2 w3: v1(385.55,1157.56) 385.55,1156.2 399.55,1142.2 399.55,1119.19 408.97,1109.78 452.06,1109.78 462.01,1119.73 462.01,1127.83 472.83,1138.65 480.93,1138.65 491.78,1149.5 491.78,1192.55 480.07,1204.26 471.97,1204.26 463.76,1212.47 463.76,1283.56 448.56,1298.76 440.46,1298.76 428.76,1310.45 428.76,1318.55 418.81,1328.5 410.71,1328.5 398.14,1341.08 398.14,1349.18 387.76,1359.56 379.65,1359.56 365,1374.22 365,1796.24 365,1860 501,1996 867.42,1996 944.96,1918.46 1105,1758.42 1105,1600 v2(1035,1530)
  Bottom Layer w3: U4.130@887.56,1488.27 953.27,1488.27 995,1530 v2(1035,1530)
TMR4: U1.V12 U4.102 | length 847.3
  Top Layer w5: U1.V12@556.5,1202.52 556.5,1202.08 569.75,1188.83 v1(569.75,1188.39)
  MidLayer2 w3: v1(569.75,1188.39) 585.56,1188.39 599.13,1201.96 607.23,1201.96 621.24,1215.96 621.24,1224.07 631.19,1234.02 639.29,1234.02 649.64,1244.37 649.64,1254.64 658.76,1263.76 736.24,1263.76 747.22,1252.78 747.22,1212.47 755.42,1204.27 761.22,1204.27 772.72,1192.77 772.72,1132.08 775.22,1129.58 775.22,1112.57 764.5,1101.84 764.5,1058.32 778.13,1044.69 788.24,1044.69 790,1042.93 790,1034.61 780.89,1025.5 773.58,1025.5 764.5,1016.42 764.5,845.5 805,805 v2(835,805)
  Bottom Layer w5: v2(835,805) 848.98,818.98 U4.102@887.56,818.98
TMR5: U1.V11 U4.106 | length 769.2
  Top Layer w5: U1.V11@525,1202.52 525,1200.96 537.63,1188.33 v1(537.63,1186.77)
  MidLayer2 w3: v1(537.63,1186.77) 553.25,1202.39 576.16,1202.39 589.74,1215.97 589.74,1224.07 600.67,1235 615,1235 621.24,1241.24 621.24,1255.56 632.93,1267.26 653.77,1267.26 656.28,1269.76 738.72,1269.76 744.72,1263.76 767.02,1263.76 778.72,1252.07 778.72,1149.48 788.67,1139.53 796.77,1139.53 806.72,1129.58 806.72,1091.72 796.24,1081.24 780.5,1065.5 v2(780.5,1064.5)
  Bottom Layer w3: v2(780.5,1064.5) 764.5,1048.5 764.5,970.5 797.91,937.09 U4.106@887.56,937.09
TMR6: U1.Y10 U4.110 | length 758.9
  Top Layer w3: v1(477.76,1123.78) 491.76,1109.78 984.71,1109.78 994.49,1119.56 994.49,1120 v2(995,1120)
  Top Layer w5: v1(477.76,1123.78) U1.Y10@493.5,1139.53
  Bottom Layer w3: U4.110@887.56,1015.83 975.83,1015.83 1005.5,1045.5 1005.5,1109.5 v2(995,1120)
TMR8: U1.V17 U4.24 | length 1214.8
  Top Layer w5: U1.V17@713.98,1202.52 v1(729.72,1186.77)
  MidLayer2 w3: v2(35,1315) 75,1315 90,1300 90,1055 130,1015 391.13,1015 416.13,990 653.69,990 715.72,1052.04 715.72,1172.5 729.72,1186.49 v1(729.72,1186.77)
  Bottom Layer w3: v2(35,1315) 55.19,1335.19 87.88,1335.19 U4.24@92.28,1330.79
TMR9: U1.V18 U4.25 | length 1209
  Top Layer w5: U1.V18@745.47,1202.52 745.47,1201.31 758.72,1188.07 v1(758.72,1186.86)
  MidLayer2 w3: v2(139.5,1315) 139.5,1314.5 125,1300 125,1055 150,1030 397.1,1030 410.28,1016.83 602.38,1016.83 648.23,1062.67 648.23,1129.8 649.24,1130.81 649.24,1194.24 659.27,1204.27 704.03,1204.27 712.72,1212.97 712.72,1223.57 721.42,1232.27 733.02,1232.27 741.22,1224.07 741.22,1206.55 758.72,1189.06 v1(758.72,1186.86)
  Bottom Layer w3: U4.25@92.28,1350.47 117.87,1350.47 125,1343.35 125,1343.25 138.75,1329.5 138.75,1315.75 v2(139.5,1315)
TMR10: U1.U17 U4.26 | length 1254.6
  Top Layer w5: U1.U17@713.98,1234.02 713.98,1232.76 727.22,1219.52 v1(727.22,1218.27)
  MidLayer2 w3: v2(45,1410) 70,1410 110,1370 110,1055.88 142.88,1023 394.21,1023 412.21,1005 614.35,1005 684.23,1074.88 684.23,1161.07 692.43,1169.28 700.53,1169.28 715.42,1184.17 715.42,1203.69 727.22,1215.49 v1(727.22,1218.27)
  Bottom Layer w5: v2(45,1410) 45.24,1409.76 92.05,1409.76 U4.26@92.28,1409.53
UART0_RX: U1.V20 U4.192 | length 488.9
  Top Layer w3: v2(830,1060) 831,1059 969.38,1059 1028.38,1000 v2(1060,1000)
  Top Layer w5: U1.V20@808.46,1202.52 v1(824.21,1186.77)
  MidLayer2 w3: v1(824.21,1186.77) 846,1164.98 846,1087 830,1071 v2(830,1060)
  Bottom Layer w3: v2(1060,1000) 1063.86,996.14 U4.192@1127.72,996.14
UART0_TX: U1.R17 U4.193 | length 669.7
  Top Layer w3: v2(804.49,1063.99) 804.49,1061.49 804,1061 820.5,1044.5 965.5,1044.5 v2(1030,980)
  Top Layer w5: U1.R17@713.98,1297.01 715.22,1297.01 728.47,1283.76 v1(729.72,1283.76)
  MidLayer2 w3: v1(729.72,1283.76) 730,1283.76 732.8,1280.97 744,1280.97 755.2,1269.76 784.41,1269.76 787.79,1266.38 795.89,1266.38 808.72,1253.56 808.72,1150.97 812.72,1146.97 812.72,1081.24 812.72,1076.79 804,1068.07 804,1064.48 v2(804.49,1063.99)
  Bottom Layer w3: v2(1030,980) 1033.54,976.46 U4.193@1127.72,976.46
UART1_RX: U1.U14 U4.23 | length 1437.2
  Top Layer w5: U1.U14@619.49,1234.02 v1(635.24,1218.27)
  Bottom Layer w3: v1(635.24,1218.27) 637.54,1215.97 649.24,1215.97 660.93,1204.27 670,1204.27 684.23,1190.04 684.23,1085.77 700,1070 700,1045
  Bottom Layer w4: U4.23@92.28,1311.1 96.19,1307.2 122.39,1307.2 126.26,1303.32 145,1284.59 145,987.37 180,952.37 180,852.37 233.69,798.69 251.31,798.69 275,775 354.04,775 398.1,819.06 398.1,858.1 500.5,960.5 624.89,960.5 700,1035.61 700,1045
UART1_TX: U1.W18 U4.22 | length 1195
  Top Layer w5: U1.W18@745.47,1171.02 745.47,1169.77 758.72,1156.53 v1(758.72,1155.28)
  MidLayer2 w3: v2(40,1290) 40,1071 103,1008 388.23,1008 413.23,983 714.82,983 745,1013.18 745,1081.24 745,1127.36 758.92,1141.28 758.92,1155.07 v1(758.72,1155.28)
  Bottom Layer w3: U4.22@90.87,1290 U4.22@92.28,1291.42
  Bottom Layer w5: v2(40,1290) U4.22@90.87,1290
UART2_RX: U1.Y3 U4.124 | length 2496.9
  Top Layer w5: v1(257.28,1123.78) U1.Y3@273.03,1139.53
  MidLayer2 w3: v1(257.28,1123.78) 258.37,1122.7 271.28,1122.7 282.98,1111 304.49,1111 322.34,1128.85 324.05,1796.24 324.05,1873.85 510.7,2060.5 879.5,2060.5 1155,1785 1155,1489.47 v2(1032.35,1366.82)
  Bottom Layer w3: U4.124@887.56,1330.79 997.71,1330.79 1032.35,1365.43 v2(1032.35,1366.82)
UART2_TX: U1.Y4 U4.123 | length 2500
  Top Layer w5: v1(288.78,1125) 289.39,1125 303.92,1139.53 U1.Y4@304.53,1139.53
  MidLayer2 w3: v1(288.78,1125) 315.34,1151.56 316,1172.03 317.01,1796.24 317.01,1876.71 507.8,2067.5 877.5,2067.5 882.4,2067.5 1162,1787.9 1162,1783 1162,1440.08 1035.79,1313.87 v2(1001.95,1313.87)
  Bottom Layer w3: U4.123@887.56,1311.1 999.18,1311.1 v2(1001.95,1313.87)
UART3_RX: U1.V7 U4.126 | length 2311.5
  Top Layer w5: v1(383.27,1186.77) U1.V7@399.02,1202.52
  MidLayer2 w3: v1(383.27,1186.77) 394.92,1198.43 394.92,1223.32 385.21,1233.03 361.09,1233.03 331.25,1262.87 331.25,1796.24 331.25,1871.15 485.1,2025 895,2025 1145,1775 1145,1500 1045,1400 v2(1020,1400)
  Bottom Layer w3: U4.126@888.03,1410 U4.126@887.56,1409.53 891.96,1405.12 1010.28,1405.12 1015.4,1400 v2(1020,1400)
UART3_TX: U1.W6 U4.125 | length 1120.6
  Top Layer w3: U1.W6@367.52,1171.02 367.52,1155.79 379.02,1144.29 379.02,1134.76 371.55,1127.3 371.55,1109.73 380.78,1100.5 484.07,1100.5 487.07,1097.5 840.78,1097.5 858.28,1080 978.08,1080 983.58,1074.5 996.42,1074.5 1010.5,1088.58 1010.5,1126.42 975,1161.92 975,1330 v2(995,1350)
  Bottom Layer w3: U4.125@887.56,1350.47 888.03,1350 v2(995,1350)
VDD_RTC: U1.E13 U4.72 | length 441.3
  Top Layer w5: U1.E13@587.99,1611.97 588.85,1611.97 602.88,1626 v1(603.74,1626)
  Bottom Layer w3: U4.72@332.44,1468.58 360,1468.58 360,1470.55 374.45,1485 495,1485 505,1495 505,1589.54 520.07,1604.62 520.07,1623.27 541.8,1645 584.74,1645 v1(603.74,1626)
pads on no net: D1.2 RN9.2 RN9.4 RN9.5 RN9.7 U1.A12 U1.B1 U1.B10 U1.B19 U1.C1 U1.C2 U1.C3 U1.C16 U1.C17 U1.C18 U1.D2 U1.D3 U1.D6 U1.D9 U1.D10 U1.D11 U1.D18 U1.E1 U1.E2 U1.E4 U1.E6 U1.F1 U1.F2 U1.F4 U1.F5 U1.G1 U1.G2 U1.G3 U1.G4 U1.H1 U1.H2 U1.H4 U1.J1 U1.J2 U1.J3 U1.J4 U1.K1 U1.K2 U1.K3 U1.K4 U1.K5 U1.L1 U1.L2 U1.L3 U1.L4 U1.L5 U1.L16 U1.M1 U1.M2 U1.M3 U1.M4 U1.M5 U1.M16 U1.M18 U1.N1 U1.N2 U1.N3 U1.N4 U1.N16 U1.N17 U1.N18 U1.N19 U1.P1 U1.P2 U1.P3 U1.P4 U1.P5 U1.P17 U1.P18 U1.P20 U1.R1 U1.R2 U1.R3 U1.R4 U1.R19 U1.T1 U1.T2 U1.T3 U1.T4 U1.T17 U1.T18 U1.T19 U1.T20 U1.U1 U1.U2 U1.U3 U1.U4 U1.U6 U1.U10 U1.U11 U1.U12 U1.U15 U1.U16 U1.U18 U1.U19 U1.U20 U1.V1 U1.V2 U1.V9 U1.V10 U1.V14 U1.V15 U1.V16 U1.V19 U1.W9 U1.W10 U1.W11 U1.W12 U1.W16 U1.W17 U1.W19 U1.W20 U1.Y5 U1.Y6 U1.Y8 U1.Y9 U1.Y11 U1.Y12 U1.Y16 U1.Y17 U1.Y18 U1.Y19 U2.F9 U3.B6 U3.B8 U3.E8 U3.F1 U3.G2 U3.H1 U3.H8 U4.1 U4.2 U4.3 U4.4 U4.5 U4.6 U4.7 U4.8 U4.9 U4.10 U4.11 U4.12 U4.13 U4.14 U4.15 U4.16 U4.17 U4.18 U4.19 U4.20 U4.21 U4.27 U4.28 U4.29 U4.30 U4.31 U4.32 U4.33 U4.35 U4.36 U4.37 U4.38 U4.39 U4.40 U4.41 U4.42 U4.43 U4.44 U4.45 U4.46 U4.47 U4.48 U4.49 U4.50 U4.62 U4.63 U4.65 U4.66 U4.69 U4.70 U4.73 U4.74 U4.75 U4.77 U4.78 U4.79 U4.80 U4.81 U4.82 U4.83 U4.84 U4.85 U4.86 U4.95 U4.96 U4.97 U4.98 U4.99 U4.100 U4.101 U4.103 U4.104 U4.105 U4.107 U4.108 U4.109 U4.111 U4.112 U4.113 U4.114 U4.116 U4.122 U4.131 U4.132 U4.133 U4.135 U4.136 U4.137 U4.138 U4.139 U4.140 U4.141 U4.142 U4.143 U4.144 U4.145 U4.146 U4.147 U4.148 U4.149 U4.150 U4.155 U4.156 U4.157 U4.158 U4.159 U4.160 U4.161 U4.162 U4.163 U4.164 U4.165 U4.166 U4.167 U4.168 U4.169 U4.170 U4.171 U4.172 U4.173 U4.174 U4.175 U4.176 U4.177 U4.178 U4.179 U4.180 U4.181 U4.182 U4.185 U4.186 U4.187 U4.188 U4.189 U4.190 U4.191 U4.194 U4.195 U4.196 U4.197 U4.198 U4.199 U4.200 U4.211 U4.212 U4.223 U4.224 U4.h1 U4.h2 U4.h3 U4.h4 U4.H5 U4.H6 Y2.2 Y2.3
copper on no net: | length 2026.7
  Top Layer w5: v1(194.29,1186.77) 210.04,1202.52 ; v1(194.29,1218.27) 210.04,1234.02 ; v1(194.29,1249.76) 210.04,1265.51 ; v1(194.29,1281.26) 210.04,1297.01 ; v1(194.29,1312.76) 210.04,1328.5 ; v1(194.29,1344.25) 210.04,1360 ; v1(194.29,1375.75) 210.04,1391.5 ; v1(194.29,1407.24) 210.04,1422.99 ; v1(194.29,1470.24) 210.04,1454.49 ; v1(194.29,1501.73) 210.04,1485.98 ; v1(194.29,1533.23) 210.04,1517.48 ; v1(194.29,1564.72) 210.04,1548.98 ; v1(194.29,1596.22) 210.04,1580.47 ; v1(194.29,1627.72) 210.04,1611.97 ; v1(194.29,1690.71) 210.04,1674.96 ; v1(194.29,1722.2) 210.04,1706.46 ; v1(225.79,1186.77) 241.54,1202.52 ; v1(225.79,1218.27) 241.54,1234.02 ; v1(225.79,1249.76) 241.54,1265.51 ; v1(225.79,1281.26) 241.54,1297.01 ; v1(225.79,1312.76) 241.54,1328.5 ; v1(225.79,1344.25) 241.54,1360 ; v1(225.79,1375.75) 241.54,1391.5 ; v1(225.79,1407.24) 241.54,1422.99 ; v1(225.79,1470.24) 241.54,1454.49 ; v1(225.79,1501.73) 241.54,1485.98 ; v1(225.79,1533.23) 241.54,1517.48 ; v1(225.79,1564.72) 241.54,1548.98 ; v1(225.79,1596.22) 241.54,1580.47 ; v1(225.79,1627.72) 241.54,1611.97 ; v1(257.28,1375.75) 273.03,1391.5 ; v1(257.28,1407.24) 273.03,1422.99 ; v1(257.28,1470.24) 273.03,1454.49 ; v1(257.28,1501.73) 273.03,1485.98 ; v1(257.28,1564.72) 273.03,1548.98 ; v1(288.78,1596.22) 304.53,1580.47 ; v1(414.76,1123.78) 430.51,1139.53 ; v1(446.26,1123.78) 462.01,1139.53 ; v1(446.26,1155.28) 462.01,1171.02 ; v1(446.26,1186.77) 462.01,1202.52 ; v1(446.26,1659.21) 462.01,1643.46 ; v1(477.76,1155.28) 493.5,1171.02 ; v1(477.76,1186.77) 493.5,1202.52 ; v1(477.76,1218.27) 493.5,1234.02 ; v1(477.76,1659.21) 493.5,1643.46 ; v1(477.76,1722.2) 493.5,1706.46 ; 525,1139.53 v1(540.75,1123.78) ; 525,1171.02 v1(540.75,1155.28) ; 525,1234.02 v1(540.75,1218.27) ; 525,1643.46 v1(540.75,1659.21) ; 556.5,1139.53 v1(572.24,1123.78) ; 556.5,1171.02 v1(572.24,1155.28) ; 556.5,1234.02 v1(572.24,1218.27) ; 556.5,1737.95 v1(572.24,1753.7) ; 619.49,1202.52 v1(635.24,1186.77) ; 650.98,1202.52 v1(666.73,1186.77) ; 650.98,1234.02 v1(666.73,1218.27) ; 682.48,1139.53 v1(698.23,1123.78) ; 682.48,1171.02 v1(698.23,1155.28) ; 682.48,1202.52 v1(698.23,1186.77) ; 682.48,1234.02 v1(698.23,1218.27) ; 682.48,1360 v1(698.23,1344.25) ; 682.48,1391.5 v1(698.23,1375.75) ; 682.48,1422.99 v1(698.23,1407.24) ; 682.48,1674.96 v1(698.23,1690.71) ; 713.98,1139.53 v1(729.72,1123.78) ; 713.98,1171.02 729.72,1155.28 ; 713.98,1265.51 v1(729.72,1249.76) ; 713.98,1328.5 v1(729.72,1312.76) ; 713.98,1360 v1(729.72,1344.25) ; 713.98,1674.96 v1(729.72,1690.71) ; 745.47,1139.53 v1(761.22,1123.78) ; 745.47,1234.02 v1(761.22,1218.27) ; 745.47,1265.51 v1(761.22,1249.76) ; 745.47,1328.5 v1(761.22,1312.76) ; 745.47,1360 v1(761.22,1344.25) ; 745.47,1391.5 v1(761.22,1375.75) ; 745.47,1643.46 v1(761.22,1659.21) ; 745.47,1674.96 v1(761.22,1690.71) ; 776.97,1139.53 v1(792.72,1123.78) ; 776.97,1171.02 v1(792.72,1155.28) ; 776.97,1202.52 v1(792.72,1186.77) ; 776.97,1234.02 v1(792.72,1218.27) ; 776.97,1265.51 v1(792.72,1249.76) ; 776.97,1297.01 v1(792.72,1281.26) ; 776.97,1360 v1(792.72,1344.25) ; 776.97,1706.46 v1(792.72,1722.2) ; 808.46,1171.02 v1(824.21,1155.28) ; 808.46,1234.02 v1(824.21,1218.27) ; 808.46,1265.51 v1(824.21,1249.76) ; 808.46,1328.5 v1(824.21,1312.76)

## Polygon pours and split planes (outlines as drawn)
+2V5 on Bottom Layer "+2V5_L06_P000" (solid, pour order 0): 525,1610 590,1610 590,1580 619.86,1580 619.86,1550 650,1550 650,1580 680,1580 680,1540 680,1455 619.86,1455 619.86,1518.18 580,1518.12 580,1580 525,1580
GND on GND+SHIELD (split plane): 1204.9,15.1 25,15.1 15.1,15.1 15.1,2699.9 1204.9,2699.9
+3V3 on PWR (split plane): 1204.9,15.1 25,15.1 15.1,15.1 15.1,1042.96 360,1042.96 360.78,1043.12 361.44,1043.56 361.88,1044.22 362.04,1045 362.04,1297.96 457.96,1297.96 457.96,1265 458.12,1264.22 458.56,1263.56 459.22,1263.12 460,1262.96 650,1262.96 650.78,1263.12 651.44,1263.56 651.88,1264.22 652.04,1265 652.04,1387.96 712.96,1387.96 712.96,837.04 623.75,837.04 622.97,836.88 622.7,836.71 622.31,836.44 602.91,817.04 350,817.04 349.22,816.88 348.56,816.44 348.12,815.78 347.96,815 347.96,240 348.12,239.22 348.56,238.56 349.22,238.12 350,237.96 810,237.96 810.78,238.12 811.44,238.56 811.88,239.22 812.04,240 812.04,1090 812.04,1450 812.04,1485 811.88,1485.78 811.44,1486.44 810.78,1486.88 810,1487.04 688.9,1487.04 687.04,1488.9 687.04,1581.41 686.88,1582.19 686.44,1582.85 685.78,1583.3 685,1583.45 650,1583.45 649.22,1583.3 648.56,1582.85 648.12,1582.19 647.96,1581.41 647.96,1552.04 622.04,1552.04 622.04,1580 621.88,1580.78 621.44,1581.44 620.78,1581.88 620,1582.04 462.04,1582.04 462.04,1610 461.88,1610.78 461.44,1611.44 460.78,1611.88 460,1612.04 430,1612.04 429.22,1611.88 428.56,1611.44 428.12,1610.78 427.96,1610 427.96,1585 427.96,1582.04 400,1582.04 399.22,1581.88 398.56,1581.44 398.12,1580.78 397.96,1580 397.96,1552.04 342.04,1552.04 342.04,1942.96 445,1942.96 445.78,1943.12 446.44,1943.56 446.88,1944.22 447.04,1945 447.04,2520 446.88,2520.78 446.44,2521.44 445.78,2521.88 445,2522.04 265,2522.04 264.22,2521.88 263.56,2521.44 263.12,2520.78 262.96,2520 262.96,1922.04 155,1922.04 154.22,1921.88 153.56,1921.44 153.12,1920.78 152.96,1920 152.96,1352.04 15.1,1352.04 15.1,2699.9 1204.9,2699.9
+2V5 on PWR (split plane): 682.96,1488.06 683.12,1487.28 683.56,1486.62 686.62,1483.56 687.28,1483.12 688.06,1482.96 807.96,1482.96 807.96,1450 807.96,1090 807.96,242.04 352.04,242.04 352.04,812.96 603.75,812.96 604.53,813.12 605.19,813.56 624.59,832.96 715,832.96 715.78,833.12 716.44,833.56 716.88,834.22 717.04,835 717.04,1428.47 717.04,1430 716.88,1430.78 716.44,1431.44 715.78,1431.88 715,1432.04 622.04,1432.04 622.04,1515 621.88,1515.78 621.44,1516.44 620.78,1516.88 620,1517.04 592.04,1517.04 592.04,1547.96 650,1547.96 650.78,1548.12 651.44,1548.56 651.88,1549.22 652.04,1550 652.04,1579.37 682.96,1579.37
+VDD_INT on PWR (split plane): 442.96,1947.04 340,1947.04 339.22,1946.88 338.56,1946.44 338.12,1945.78 337.96,1945 337.96,1551.53 338.11,1550.76 337.96,1550 338.12,1549.22 338.56,1548.56 339.22,1548.12 340,1547.96 400,1547.96 400.78,1548.12 401.44,1548.56 401.88,1549.22 402.04,1550 402.04,1577.96 430,1577.96 430.78,1578.12 431.44,1578.56 431.88,1579.22 432.04,1580 432.04,1585 432.04,1607.96 457.96,1607.96 457.96,1580 458.12,1579.22 458.56,1578.56 459.22,1578.12 460,1577.96 617.96,1577.96 617.96,1552.04 590,1552.04 589.22,1551.88 588.56,1551.44 588.12,1550.78 587.96,1550 587.96,1515 588.12,1514.22 588.56,1513.56 589.22,1513.12 590,1512.96 617.96,1512.96 617.96,1430 618.12,1429.22 618.56,1428.56 619.22,1428.12 620,1427.96 712.63,1427.96 712.96,1427.63 712.96,1392.04 650,1392.04 649.22,1391.88 648.56,1391.44 648.12,1390.78 647.96,1390 647.96,1267.04 462.04,1267.04 462.04,1300 461.88,1300.78 461.44,1301.44 460.78,1301.88 460,1302.04 360,1302.04 359.22,1301.88 358.56,1301.44 358.12,1300.78 357.96,1300 357.96,1047.04 15.1,1047.04 15.1,1347.96 155,1347.96 155.78,1348.12 156.44,1348.56 156.88,1349.22 157.04,1350 157.04,1917.96 265,1917.96 265.78,1918.12 266.44,1918.56 266.88,1919.22 267.04,1920 267.04,2517.96 442.96,2517.96

## Other copper
PWR (plane layer: these items are gaps in the copper):
  lines w4: 340,1550 400,1550 400,1580 430,1580 430,1585 430,1610 460,1610 460,1580 470,1580 620,1580 620,1550 ; 340,1551.53 340,1945 445,1945 445,2520 265,2520 265,1920 195,1920 155,1920 155,1350 10,1350 10,1045 360,1045 360,1300 460,1300 460,1265 650,1265 650,1390 715,1390 715,1430 620,1430 620,1515 590,1515 590,1550 620,1550 ; 665,1430 713.47,1430 715,1428.47 715,835 623.75,835 603.75,815 461.25,815 350,815 350,240 810,240 810,1090 810,1450 810,1485 688.06,1485 685,1488.06 685,1581.41 650,1581.41 650,1550 620,1550

## Silkscreen, mask and mechanical layers (free items; w line width, h text height)
Top Overlay:
  lines w10: 10,1130 155,1130 155,1405 150,1410 10,1410 10,1170 10,1130 ; 935,1840 1070,1840 1070,2000 935,2000 935,1840
Bottom Overlay:
  text "MARS Robotics" at 1094,181 h35
  text "V1I1" at 939,121 h35
  text "2102" at 1099,121 h35
  text "(C) Copyright All rights reseved" at 1099,52.66 h35
BORDER_LAYER:
  the board outline again, w5
Mechanical 15:
  drawing of 651 lines, arcs and shapes, not listed
  text "1. All dimensions are in mil." at 1375,2665 h49.21
  text "Layer" at 1389.32,2543.32 h20.86
  text "Name" at 1534.91,2543.32 h20.86
  text "Material" at 1861.25,2543.32 h20.86
  text "Thickness" at 2163.26,2543.32 h20.86
  text "Constant" at 2392.27,2543.32 h20.86
  text "Board Layer Stack" at 2593.47,2543.32 h20.86
  text "Top Overlay" at 1534.91,2501.59 h20.86
  text "Top Solder" at 1534.91,2459.87 h20.86
  text "Solder Resist" at 1861.25,2459.87 h20.86
  text "0.40mil" at 2163.26,2459.87 h20.86
  text "3.5" at 2392.27,2459.87 h20.86
  text "1" at 1389.32,2418.14 h20.86
  text "Top Layer" at 1534.91,2418.14 h20.86
  text "Copper" at 1861.25,2418.14 h20.86
  text "1.40mil" at 2163.26,2418.14 h20.86
  text "Dielectric1" at 1534.91,2376.41 h20.86
  text "FR-4" at 1861.25,2376.41 h20.86
  text "9.00mil" at 2163.26,2376.41 h20.86
  text "4.8" at 2392.27,2376.41 h20.86
  text "2" at 1389.32,2334.69 h20.86
  text "GND+SHIELD" at 1534.91,2334.69 h20.86
  text "Copper" at 1861.25,2334.69 h20.86
  text "1.40mil" at 2163.26,2334.69 h20.86
  text "Dielectric4" at 1534.91,2292.96 h20.86
  text "FR-4" at 1861.25,2292.96 h20.86
  text "4.20mil" at 2163.26,2292.96 h20.86
  text "4.8" at 2392.27,2292.96 h20.86
  text "3" at 1389.32,2251.23 h20.86
  text "MidLayer1" at 1534.91,2251.23 h20.86
  text "Copper" at 1861.25,2251.23 h20.86
  text "1.40mil" at 2163.26,2251.23 h20.86
  text "Dielectric2" at 1534.91,2209.5 h20.86
  text "FR-4" at 1861.25,2209.5 h20.86
  text "26.00mil" at 2163.26,2209.5 h20.86
  text "4.8" at 2392.27,2209.5 h20.86
  text "4" at 1389.32,2167.78 h20.86
  text "MidLayer2" at 1534.91,2167.78 h20.86
  text "Copper" at 1861.25,2167.78 h20.86
  text "1.40mil" at 2163.26,2167.78 h20.86
  text "Dielectric3" at 1534.91,2126.05 h20.86
  text "FR-4" at 1861.25,2126.05 h20.86
  text "4.20mil" at 2163.26,2126.05 h20.86
  text "4.8" at 2392.27,2126.05 h20.86
  text "5" at 1389.32,2084.32 h20.86
  text "PWR" at 1534.91,2084.32 h20.86
  text "Copper" at 1861.25,2084.32 h20.86
  text "1.40mil" at 2163.26,2084.32 h20.86
  text "Dielectric5" at 1534.91,2042.6 h20.86
  text "FR-4" at 1861.25,2042.6 h20.86
  text "9.00mil" at 2163.26,2042.6 h20.86
  text "4.8" at 2392.27,2042.6 h20.86
  text "6" at 1389.32,2000.87 h20.86
  text "Bottom Layer" at 1534.91,2000.87 h20.86
  text "Copper" at 1861.25,2000.87 h20.86
  text "1.40mil" at 2163.26,2000.87 h20.86
  text "Bottom Solder" at 1534.91,1959.14 h20.86
  text "Solder Resist" at 1861.25,1959.14 h20.86
  text "0.40mil" at 2163.26,1959.14 h20.86
  text "3.5" at 2392.27,1959.14 h20.86
  text "Bottom Overlay" at 1534.91,1917.41 h20.86

## Text inside footprints (layer, text, board x,y; h text height)
RN1: Mechanical 13 "*" at 678,132 h50 r90
RN2: Mechanical 13 "*" at 458,132 h50 r90
RN3: Mechanical 13 "*" at 267,337 h50
RN4: Mechanical 13 "*" at 948.5,283.5 h50 r180
RN5: Mechanical 13 "*" at 732.5,943.5 h50 r270
RN6: Mechanical 13 "*" at 948,858 h50 r180
RN7: Mechanical 13 "*" at 943,513 h50 r180
RN8: Mechanical 13 "*" at 520.65,943.5 h50 r270
RN9: Mechanical 13 "*" at 102.5,458.35 h50
RN10: Mechanical 13 "*" at 261.5,906.5 h50
U2: Top Overlay "1" at 497.99,762.83 h50 r90; Top Overlay "A" at 412.99,717.83 h50
U6: Mechanical 13 "*" at 689,2499.5 h50 r180; Bottom Overlay "*" at 810,2465 h50 r270